# Altium PCB K601-6252双模带屏 VER 1.1 2026 10 16.PcbDoc (part 2 of 12)
Units mm, origin at the board's own origin, x right, y up, seen from the top; angles counter-clockwise.
Board outline 75.02 x 25.73 mm, 2 copper layers (Top Layer, Bottom Layer); 43 components, 67 nets, 219 pads, 157 vias.
Unrouted connection lines stored in the file: 1.
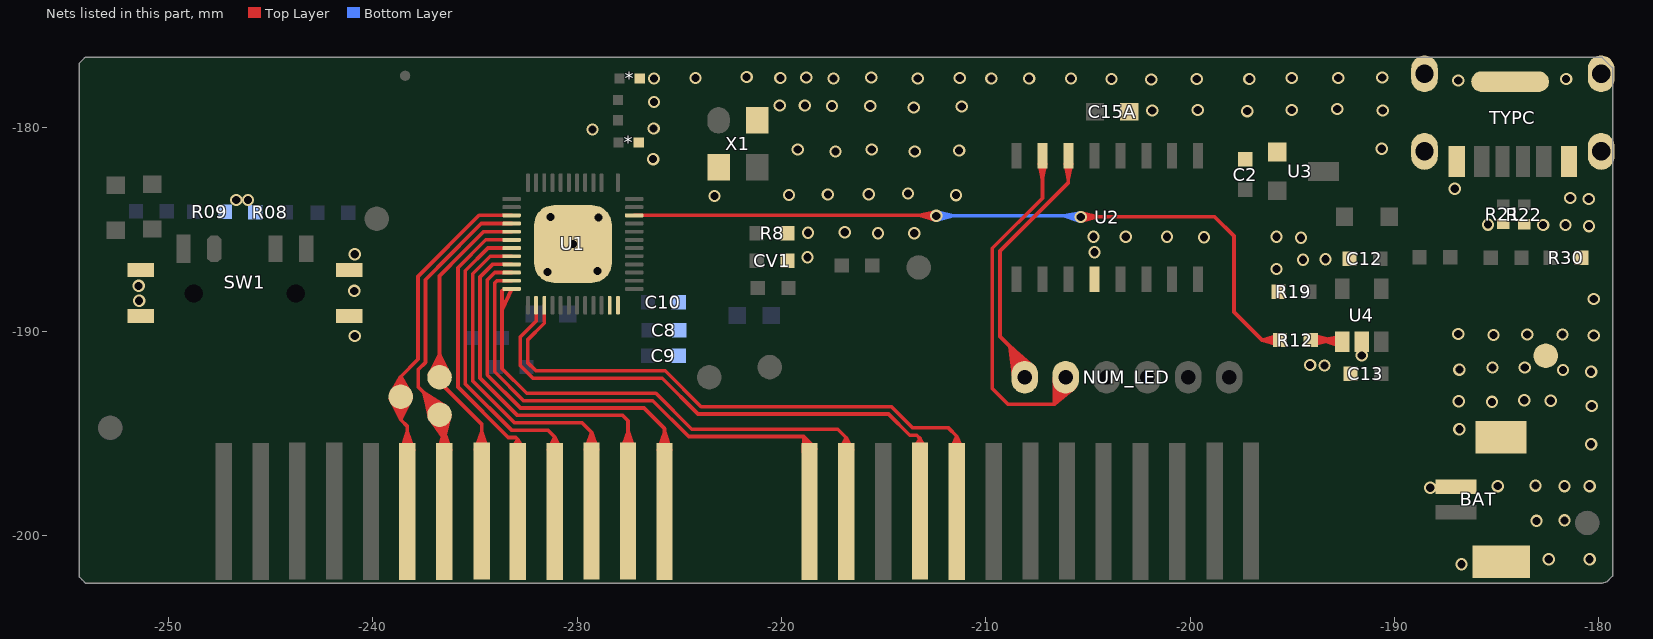
[diagram p2: the nets of this part, all layers, seen from the top]

## Via types
v1: diameter 0.6, hole 0.4, Top Layer to Bottom Layer, tented both sides, 154 vias
v2: diameter 0.6, hole 0.4, Top Layer to Bottom Layer, 3 vias

## Nets (pads, with @x,y where several pads share a name; then routed paths per layer and width w, separated by ;. In a path a pad name is that pad's centre, name@x,y a point inside that pad or via, vN(x,y) a via of type N, cw(c..) or ccw(c..) an arc to the next point about the centre after c; other vN are vias at no path point) (continued)
C6: ?.1@-238.299,-198.813 pad.@-238.625,-193.198 U1.15 | length 166.6
  Top Layer w0.18: ?.1@-238.299,-198.813 -238.299,-194.653 -238.625,-194.326 ; U1.15@-233.2,-184.323 -234.789,-184.323 -237.777,-187.311 -237.777,-191.368 -238.625,-192.216 ; pad.@-239.122,-193.313 -238.625,-194.326 ; pad.@-239.122,-193.313 -238.625,-194.326 ; pad.@-239.122,-193.313 -238.625,-194.326 ; pad.@-239.122,-193.313 -238.625,-194.326 ; pad.@-239.122,-193.313 -238.625,-194.326 ; pad.@-239.122,-193.313 -238.625,-194.326 ; pad.@-239.122,-193.313 -238.625,-194.326 ; pad.@-239.122,-193.313 -238.625,-194.326 ; pad.@-239.118,-193.065 -238.625,-192.216 ; pad.@-239.118,-193.065 -238.625,-192.216 ; pad.@-239.118,-193.065 -238.625,-192.216 ; pad.@-239.118,-193.065 -238.625,-192.216 ; pad.@-239.118,-193.065 -238.625,-192.216 ; pad.@-239.118,-193.065 -238.625,-192.216 ; pad.@-239.118,-193.065 -238.625,-192.216 ; pad.@-239.118,-193.065 -238.625,-192.216 ; pad.@-238.952,-193.246 -238.625,-194.326 ; pad.@-238.952,-193.246 -238.625,-194.326 ; pad.@-238.952,-193.246 -238.625,-194.326 ; pad.@-238.952,-193.246 -238.625,-194.326 ; pad.@-238.952,-193.246 -238.625,-194.326 ; pad.@-238.952,-193.246 -238.625,-194.326 ; pad.@-238.952,-193.246 -238.625,-194.326 ; pad.@-238.952,-193.246 -238.625,-194.326 ; pad.@-238.95,-193.142 -238.625,-192.216 ; pad.@-238.95,-193.142 -238.625,-192.216 ; pad.@-238.95,-193.142 -238.625,-192.216 ; pad.@-238.95,-193.142 -238.625,-192.216 ; pad.@-238.95,-193.142 -238.625,-192.216 ; pad.@-238.95,-193.142 -238.625,-192.216 ; pad.@-238.95,-193.142 -238.625,-192.216 ; pad.@-238.95,-193.142 -238.625,-192.216 ; pad.@-238.775,-193.208 -238.625,-194.326 ; pad.@-238.775,-193.208 -238.625,-194.326 ; pad.@-238.775,-193.208 -238.625,-194.326 ; pad.@-238.775,-193.208 -238.625,-194.326 ; pad.@-238.775,-193.208 -238.625,-194.326 ; pad.@-238.775,-193.208 -238.625,-194.326 ; pad.@-238.775,-193.208 -238.625,-194.326 ; pad.@-238.775,-193.208 -238.625,-194.326 ; pad.@-238.775,-193.186 -238.625,-192.216 ; pad.@-238.775,-193.186 -238.625,-192.216 ; pad.@-238.775,-193.186 -238.625,-192.216 ; pad.@-238.775,-193.186 -238.625,-192.216 ; pad.@-238.775,-193.186 -238.625,-192.216 ; pad.@-238.775,-193.186 -238.625,-192.216 ; pad.@-238.775,-193.186 -238.625,-192.216 ; pad.@-238.775,-193.186 -238.625,-192.216 ; -238.625,-194.326 pad.@-238.625,-193.198 ; -238.625,-194.326 pad.@-238.128,-193.313 ; -238.625,-194.326 pad.@-238.299,-193.246 ; -238.625,-194.326 pad.@-238.475,-193.208 ; -238.625,-194.326 pad.@-238.128,-193.313 ; -238.625,-194.326 pad.@-238.299,-193.246 ; -238.625,-194.326 pad.@-238.475,-193.208 ; -238.625,-194.326 pad.@-238.128,-193.313 ; -238.625,-194.326 pad.@-238.299,-193.246 ; -238.625,-194.326 pad.@-238.475,-193.208 ; -238.625,-194.326 pad.@-238.625,-193.198 ; -238.625,-194.326 pad.@-238.128,-193.313 ; -238.625,-194.326 pad.@-238.299,-193.246 ; -238.625,-194.326 pad.@-238.475,-193.208 ; -238.625,-194.326 pad.@-238.625,-193.198 ; -238.625,-194.326 pad.@-238.128,-193.313 ; -238.625,-194.326 pad.@-238.299,-193.246 ; -238.625,-194.326 pad.@-238.475,-193.208 ; -238.625,-194.326 pad.@-238.625,-193.198 ; -238.625,-194.326 pad.@-238.128,-193.313 ; -238.625,-194.326 pad.@-238.299,-193.246 ; -238.625,-194.326 pad.@-238.475,-193.208 ; -238.625,-194.326 pad.@-238.625,-193.198 ; -238.625,-194.326 pad.@-238.128,-193.313 ; -238.625,-194.326 pad.@-238.299,-193.246 ; -238.625,-194.326 pad.@-238.475,-193.208 ; -238.625,-194.326 pad.@-238.625,-193.198 ; -238.625,-194.326 pad.@-238.128,-193.313 ; -238.625,-194.326 pad.@-238.299,-193.246 ; -238.625,-194.326 pad.@-238.475,-193.208 ; -238.625,-194.326 pad.@-238.625,-193.198 ; pad.@-238.625,-193.198 -238.625,-192.216 ; pad.@-238.625,-193.198 -238.625,-192.216 ; pad.@-238.625,-193.198 -238.625,-192.216 ; pad.@-238.625,-193.198 -238.625,-192.216 ; pad.@-238.625,-193.198 -238.625,-192.216 ; pad.@-238.625,-193.198 -238.625,-192.216 ; pad.@-238.625,-193.198 -238.625,-192.216 ; -238.625,-192.216 pad.@-238.133,-193.065 ; -238.625,-192.216 pad.@-238.3,-193.142 ; -238.625,-192.216 pad.@-238.476,-193.186 ; -238.625,-192.216 pad.@-238.133,-193.065 ; -238.625,-192.216 pad.@-238.3,-193.142 ; -238.625,-192.216 pad.@-238.476,-193.186 ; -238.625,-192.216 pad.@-238.133,-193.065 ; -238.625,-192.216 pad.@-238.3,-193.142 ; -238.625,-192.216 pad.@-238.476,-193.186 ; -238.625,-192.216 pad.@-238.133,-193.065 ; -238.625,-192.216 pad.@-238.3,-193.142 ; -238.625,-192.216 pad.@-238.476,-193.186 ; -238.625,-192.216 pad.@-238.133,-193.065 ; -238.625,-192.216 pad.@-238.3,-193.142 ; -238.625,-192.216 pad.@-238.476,-193.186 ; -238.625,-192.216 pad.@-238.133,-193.065 ; -238.625,-192.216 pad.@-238.3,-193.142 ; -238.625,-192.216 pad.@-238.476,-193.186 ; -238.625,-192.216 pad.@-238.133,-193.065 ; -238.625,-192.216 pad.@-238.3,-193.142 ; -238.625,-192.216 pad.@-238.476,-193.186 ; -238.625,-192.216 pad.@-238.133,-193.065 ; -238.625,-192.216 pad.@-238.3,-193.142 ; -238.625,-192.216 pad.@-238.476,-193.186 ; ?.1@-238.605,-195.812 -238.299,-194.923 ; ?.1@-238.605,-195.812 -238.299,-194.923 ; ?.1@-238.605,-195.812 -238.299,-194.923 ; ?.1@-238.605,-195.812 -238.299,-194.923 ; ?.1@-238.605,-195.812 -238.299,-194.923 ; ?.1@-238.605,-195.812 -238.299,-194.923 ; ?.1@-238.605,-195.812 -238.299,-194.923 ; ?.1@-238.429,-195.854 -238.299,-194.923 ; ?.1@-238.429,-195.854 -238.299,-194.923 ; ?.1@-238.429,-195.854 -238.299,-194.923 ; ?.1@-238.429,-195.854 -238.299,-194.923 ; ?.1@-238.429,-195.854 -238.299,-194.923 ; ?.1@-238.429,-195.854 -238.299,-194.923 ; ?.1@-238.429,-195.854 -238.299,-194.923 ; ?.1@-238.299,-195.863 -238.299,-194.923 ; ?.1@-238.299,-195.863 -238.299,-194.923 ; ?.1@-238.299,-195.863 -238.299,-194.923 ; ?.1@-238.299,-195.863 -238.299,-194.923 ; ?.1@-238.299,-195.863 -238.299,-194.923 ; ?.1@-238.299,-195.863 -238.299,-194.923 ; ?.1@-238.299,-195.863 -238.299,-194.923 ; -238.299,-194.923 ?.1@-237.993,-195.812 ; -238.299,-194.923 ?.1@-238.169,-195.854 ; -238.299,-194.923 ?.1@-237.993,-195.812 ; -238.299,-194.923 ?.1@-238.169,-195.854 ; -238.299,-194.923 ?.1@-237.993,-195.812 ; -238.299,-194.923 ?.1@-238.169,-195.854 ; -238.299,-194.923 ?.1@-237.993,-195.812 ; -238.299,-194.923 ?.1@-238.169,-195.854 ; -238.299,-194.923 ?.1@-237.993,-195.812 ; -238.299,-194.923 ?.1@-238.169,-195.854 ; -238.299,-194.923 ?.1@-237.993,-195.812 ; -238.299,-194.923 ?.1@-238.169,-195.854 ; -238.299,-194.923 ?.1@-237.993,-195.812 ; -238.299,-194.923 ?.1@-238.169,-195.854 ; -234.19,-184.323 U1.15@-233.555,-184.323 ; -234.19,-184.323 U1.15@-233.555,-184.323 ; -234.19,-184.323 U1.15@-233.555,-184.323
C7: ?.1@-236.494,-198.813 pad.@-236.725,-194.075 U1.16 | length 208.4
  Top Layer w0.18: pad.@-237.193,-194.277 -236.51,-195.216 ; pad.@-237.194,-194.275 -236.503,-195.249 ; pad.@-237.193,-194.279 -236.492,-195.247 ; pad.@-237.191,-194.282 -237.466,-193.035 ; pad.@-237.19,-194.284 -237.474,-193.032 ; pad.@-237.038,-194.181 -236.503,-195.249 ; pad.@-237.036,-194.185 -236.497,-195.213 ; pad.@-237.017,-194.229 -237.466,-193.027 ; pad.@-237.016,-194.232 -237.488,-193.011 ; pad.@-236.87,-194.114 -236.497,-195.213 ; pad.@-236.576,-194.057 -236.51,-195.216 ; ?.1@-236.494,-198.813 -236.494,-194.307 pad.@-236.725,-194.075 ; pad.@-236.396,-194.056 -236.492,-195.247 ; pad.@-236.396,-194.061 -236.51,-195.216 ; pad.@-236.396,-194.059 -236.506,-195.205 ; pad.@-236.396,-194.059 -236.503,-195.249 ; pad.@-236.378,-193.701 -237.474,-193.032 ; pad.@-236.377,-193.702 -237.466,-193.035 ; pad.@-236.376,-193.704 -237.466,-193.027 ; pad.@-236.376,-193.703 -237.488,-193.011 ; pad.@-236.374,-193.705 -237.482,-193.006 ; pad.@-236.216,-194.093 -236.51,-195.216 ; pad.@-236.215,-194.091 -236.506,-195.205 ; pad.@-236.215,-194.089 -236.503,-195.249 ; pad.@-236.215,-194.087 -236.497,-195.213 ; U1.16@-233.2,-184.723 -234.68,-184.723 -236.805,-186.848 -236.805,-186.86 -237.417,-187.473 -237.417,-191.517 -237.775,-191.875 -237.775,-192.715 -236.725,-193.765 pad.@-236.725,-194.075 ; -237.493,-192.997 pad.@-237.19,-194.285 ; -237.493,-192.997 pad.@-236.375,-193.705 ; -237.493,-192.997 pad.@-237.016,-194.231 ; -237.493,-192.997 pad.@-236.482,-193.852 ; -237.493,-192.997 pad.@-236.852,-194.155 ; -237.493,-192.997 pad.@-236.608,-193.981 ; -237.493,-192.997 pad.@-236.725,-194.075 ; -237.493,-192.997 pad.@-237.19,-194.285 ; -237.493,-192.997 pad.@-236.375,-193.705 ; -237.493,-192.997 pad.@-237.016,-194.231 ; -237.493,-192.997 pad.@-236.482,-193.852 ; -237.493,-192.997 pad.@-236.852,-194.155 ; -237.493,-192.997 pad.@-236.608,-193.981 ; -237.493,-192.997 pad.@-236.725,-194.075 ; -237.493,-192.997 pad.@-237.19,-194.285 ; -237.493,-192.997 pad.@-236.375,-193.705 ; -237.493,-192.997 pad.@-237.016,-194.231 ; -237.493,-192.997 pad.@-236.482,-193.852 ; -237.493,-192.997 pad.@-236.852,-194.155 ; -237.493,-192.997 pad.@-236.608,-193.981 ; -237.493,-192.997 pad.@-236.725,-194.075 ; -237.493,-192.997 pad.@-237.19,-194.285 ; -237.493,-192.997 pad.@-236.375,-193.705 ; -237.493,-192.997 pad.@-237.016,-194.231 ; -237.493,-192.997 pad.@-236.482,-193.852 ; -237.493,-192.997 pad.@-236.852,-194.155 ; -237.493,-192.997 pad.@-236.608,-193.981 ; -237.493,-192.997 pad.@-236.725,-194.075 ; -237.488,-193.011 pad.@-237.19,-194.286 ; -237.488,-193.011 pad.@-236.483,-193.85 ; -237.488,-193.011 pad.@-236.852,-194.155 ; -237.488,-193.011 pad.@-236.608,-193.981 ; -237.488,-193.011 pad.@-236.725,-194.075 ; -237.482,-193.006 -237.191,-194.283 -236.497,-195.213 ; -237.482,-193.006 -237.016,-194.23 -237.466,-193.035 ; -237.482,-193.006 pad.@-236.482,-193.852 ; -237.482,-193.006 pad.@-236.852,-194.155 ; -237.482,-193.006 pad.@-236.608,-193.981 ; -237.482,-193.006 pad.@-236.725,-194.075 ; -237.474,-193.032 pad.@-237.016,-194.231 ; -237.474,-193.032 pad.@-236.484,-193.85 ; -237.474,-193.032 pad.@-236.852,-194.155 ; -237.474,-193.032 pad.@-236.609,-193.981 ; -237.474,-193.032 pad.@-236.725,-194.075 ; -237.466,-193.027 -237.192,-194.281 -236.506,-195.205 ; -237.466,-193.027 pad.@-236.482,-193.851 ; -237.466,-193.027 pad.@-236.853,-194.154 ; -237.466,-193.027 pad.@-236.608,-193.981 ; -237.466,-193.027 pad.@-236.725,-194.075 ; -237.466,-193.035 pad.@-236.483,-193.85 ; -237.466,-193.035 pad.@-236.852,-194.155 ; -237.466,-193.035 pad.@-236.608,-193.981 ; -237.466,-193.035 pad.@-236.725,-194.075 ; pad.@-237.194,-194.275 -236.494,-195.267 ; pad.@-237.194,-194.275 -236.494,-195.267 ; pad.@-237.194,-194.275 -236.494,-195.267 ; pad.@-237.194,-194.275 -236.494,-195.267 ; pad.@-237.038,-194.181 -236.494,-195.267 ; pad.@-237.038,-194.181 -236.494,-195.267 ; pad.@-237.038,-194.181 -236.494,-195.267 ; pad.@-237.038,-194.181 -236.494,-195.267 ; pad.@-237.038,-194.182 -236.51,-195.216 ; pad.@-236.87,-194.113 -236.494,-195.267 ; pad.@-236.87,-194.113 -236.494,-195.267 ; pad.@-236.87,-194.113 -236.492,-195.247 ; pad.@-236.87,-194.113 -236.494,-195.267 ; pad.@-236.87,-194.113 -236.494,-195.267 ; pad.@-236.87,-194.113 -236.506,-195.205 ; ?.1@-236.799,-195.812 -236.494,-194.923 ; ?.1@-236.799,-195.812 -236.494,-194.923 ; ?.1@-236.799,-195.812 -236.494,-194.923 ; ?.1@-236.799,-195.812 -236.494,-194.923 ; ?.1@-236.799,-195.812 -236.494,-194.923 ; ?.1@-236.799,-195.812 -236.494,-194.923 ; ?.1@-236.799,-195.812 -236.494,-194.923 ; pad.@-236.725,-194.075 -236.494,-195.267 ; pad.@-236.725,-194.075 -236.494,-195.267 ; pad.@-236.725,-194.075 -236.492,-195.247 ; pad.@-236.725,-194.075 -236.494,-195.267 ; pad.@-236.725,-194.075 -236.494,-195.267 ; pad.@-236.725,-194.075 -236.503,-195.249 ; pad.@-236.725,-194.075 -236.497,-195.213 ; pad.@-236.725,-194.075 -236.51,-195.216 ; ?.1@-236.623,-195.854 -236.494,-194.923 ; ?.1@-236.623,-195.854 -236.494,-194.923 ; ?.1@-236.623,-195.854 -236.494,-194.923 ; ?.1@-236.623,-195.854 -236.494,-194.923 ; ?.1@-236.623,-195.854 -236.494,-194.923 ; ?.1@-236.623,-195.854 -236.494,-194.923 ; ?.1@-236.623,-195.854 -236.494,-194.923 ; pad.@-236.576,-194.056 -236.494,-195.267 ; pad.@-236.576,-194.056 -236.494,-195.267 ; pad.@-236.576,-194.056 -236.494,-195.267 ; pad.@-236.576,-194.056 -236.494,-195.267 ; pad.@-236.576,-194.056 -236.503,-195.249 ; pad.@-236.576,-194.056 -236.506,-195.205 ; -236.51,-195.216 -236.871,-194.112 -236.503,-195.249 ; -236.506,-195.205 -237.037,-194.184 -236.492,-195.247 ; -236.497,-195.213 pad.@-236.396,-194.057 ; -236.497,-195.213 -236.577,-194.055 -236.492,-195.247 ; ?.1@-236.494,-195.863 -236.494,-194.923 ; ?.1@-236.494,-195.863 -236.494,-194.923 ; ?.1@-236.494,-195.863 -236.494,-194.923 ; ?.1@-236.494,-195.863 -236.494,-194.923 ; ?.1@-236.494,-195.863 -236.494,-194.923 ; ?.1@-236.494,-195.863 -236.494,-194.923 ; ?.1@-236.494,-195.863 -236.494,-194.923 ; -236.494,-195.267 pad.@-236.215,-194.085 ; -236.494,-195.267 pad.@-236.396,-194.057 ; -236.494,-195.267 pad.@-236.215,-194.085 ; -236.494,-195.267 pad.@-236.396,-194.057 ; -236.494,-195.267 pad.@-236.215,-194.085 ; -236.494,-195.267 pad.@-236.396,-194.057 ; -236.494,-195.267 pad.@-236.215,-194.085 ; -236.494,-195.267 pad.@-236.396,-194.057 ; -236.494,-194.923 ?.1@-236.188,-195.812 ; -236.494,-194.923 ?.1@-236.364,-195.854 ; -236.494,-194.923 ?.1@-236.188,-195.812 ; -236.494,-194.923 ?.1@-236.364,-195.854 ; -236.494,-194.923 ?.1@-236.188,-195.812 ; -236.494,-194.923 ?.1@-236.364,-195.854 ; -236.494,-194.923 ?.1@-236.188,-195.812 ; -236.494,-194.923 ?.1@-236.364,-195.854 ; -236.494,-194.923 ?.1@-236.188,-195.812 ; -236.494,-194.923 ?.1@-236.364,-195.854 ; -236.494,-194.923 ?.1@-236.188,-195.812 ; -236.494,-194.923 ?.1@-236.364,-195.854 ; -236.494,-194.923 ?.1@-236.188,-195.812 ; -236.494,-194.923 ?.1@-236.364,-195.854 ; -236.492,-195.247 pad.@-236.215,-194.084 ; -234.19,-184.723 U1.16@-233.555,-184.723 ; -234.19,-184.723 U1.16@-233.555,-184.723 ; -234.19,-184.723 U1.16@-233.555,-184.723
C8: ?.1@-218.621,-198.813 U1.23 | length 83.6
  Top Layer w0.18: U1.23@-233.2,-187.522 -233.916,-187.522 ; ?.1@-218.621,-198.813 -218.621,-195.434 ; -233.916,-187.522 -234.026,-187.632 -234.026,-191.979 -232.614,-193.391 -226.289,-193.391 -224.534,-195.146 -218.909,-195.146 ; -233.916,-187.522 U1.23@-233.555,-187.522 ; -233.916,-187.522 U1.23@-233.555,-187.522 ; -233.916,-187.522 U1.23@-233.555,-187.522 ; ?.1@-218.926,-195.919 -218.909,-195.146 ; ?.1@-218.926,-195.919 -218.909,-195.146 ; ?.1@-218.926,-195.919 -218.909,-195.146 ; ?.1@-218.926,-195.919 -218.909,-195.146 ; ?.1@-218.926,-195.919 -218.909,-195.146 ; ?.1@-218.926,-195.919 -218.909,-195.146 ; ?.1@-218.926,-195.919 -218.909,-195.146 ; ?.1@-218.91,-195.751 -218.621,-195.434 ; ?.1@-218.91,-195.751 -218.621,-195.434 ; ?.1@-218.91,-195.751 -218.621,-195.434 ; ?.1@-218.91,-195.751 -218.621,-195.434 ; ?.1@-218.91,-195.751 -218.621,-195.434 ; ?.1@-218.91,-195.751 -218.621,-195.434 ; ?.1@-218.91,-195.751 -218.621,-195.434 ; ?.1@-218.91,-195.751 -218.621,-195.434 ; ?.1@-218.91,-195.751 -218.621,-195.434 ; ?.1@-218.91,-195.751 -218.621,-195.434 ; ?.1@-218.91,-195.751 -218.621,-195.434 ; ?.1@-218.91,-195.751 -218.621,-195.434 ; ?.1@-218.91,-195.751 -218.621,-195.434 ; ?.1@-218.91,-195.751 -218.621,-195.434 ; -218.909,-195.146 -218.621,-195.434 ; -218.909,-195.146 ?.1@-218.363,-195.692 ; -218.909,-195.146 ?.1@-218.746,-195.901 ; -218.909,-195.146 ?.1@-218.505,-195.805 ; -218.909,-195.146 ?.1@-218.621,-195.863 ; -218.909,-195.146 ?.1@-218.363,-195.692 ; -218.909,-195.146 ?.1@-218.746,-195.901 ; -218.909,-195.146 ?.1@-218.505,-195.805 ; -218.909,-195.146 ?.1@-218.621,-195.863 ; -218.909,-195.146 ?.1@-218.363,-195.692 ; -218.909,-195.146 ?.1@-218.746,-195.901 ; -218.909,-195.146 ?.1@-218.505,-195.805 ; -218.909,-195.146 ?.1@-218.621,-195.863 ; -218.909,-195.146 ?.1@-218.363,-195.692 ; -218.909,-195.146 ?.1@-218.746,-195.901 ; -218.909,-195.146 ?.1@-218.505,-195.805 ; -218.909,-195.146 ?.1@-218.621,-195.863 ; -218.909,-195.146 ?.1@-218.363,-195.692 ; -218.909,-195.146 ?.1@-218.746,-195.901 ; -218.909,-195.146 ?.1@-218.505,-195.805 ; -218.909,-195.146 ?.1@-218.621,-195.863 ; -218.909,-195.146 ?.1@-218.363,-195.692 ; -218.909,-195.146 ?.1@-218.746,-195.901 ; -218.909,-195.146 ?.1@-218.505,-195.805 ; -218.909,-195.146 ?.1@-218.621,-195.863 ; -218.909,-195.146 ?.1@-218.363,-195.692 ; -218.909,-195.146 ?.1@-218.746,-195.901 ; -218.909,-195.146 ?.1@-218.505,-195.805 ; -218.909,-195.146 ?.1@-218.621,-195.863 ; ?.1@-218.75,-195.844 -218.621,-195.434 ; ?.1@-218.75,-195.844 -218.621,-195.434 ; ?.1@-218.75,-195.844 -218.621,-195.434 ; ?.1@-218.75,-195.844 -218.621,-195.434 ; ?.1@-218.75,-195.844 -218.621,-195.434 ; ?.1@-218.75,-195.844 -218.621,-195.434 ; ?.1@-218.75,-195.844 -218.621,-195.434 ; ?.1@-218.75,-195.844 -218.621,-195.434 ; ?.1@-218.75,-195.844 -218.621,-195.434 ; ?.1@-218.75,-195.844 -218.621,-195.434 ; ?.1@-218.75,-195.844 -218.621,-195.434 ; ?.1@-218.75,-195.844 -218.621,-195.434 ; ?.1@-218.75,-195.844 -218.621,-195.434 ; ?.1@-218.75,-195.844 -218.621,-195.434 ; ?.1@-218.621,-195.863 -218.621,-195.434 ; ?.1@-218.621,-195.863 -218.621,-195.434 ; ?.1@-218.621,-195.863 -218.621,-195.434 ; ?.1@-218.621,-195.863 -218.621,-195.434 ; ?.1@-218.621,-195.863 -218.621,-195.434 ; ?.1@-218.621,-195.863 -218.621,-195.434 ; ?.1@-218.621,-195.863 -218.621,-195.434 ; ?.1@-218.621,-195.863 -218.621,-195.434 ; ?.1@-218.621,-195.863 -218.621,-195.434 ; ?.1@-218.621,-195.863 -218.621,-195.434 ; ?.1@-218.621,-195.863 -218.621,-195.434 ; ?.1@-218.621,-195.863 -218.621,-195.434 ; ?.1@-218.621,-195.863 -218.621,-195.434 ; ?.1@-218.621,-195.863 -218.621,-195.434 ; -218.621,-195.434 ?.1@-218.332,-195.751 ; -218.621,-195.434 ?.1@-218.493,-195.844 ; -218.621,-195.434 ?.1@-218.332,-195.751 ; -218.621,-195.434 ?.1@-218.493,-195.844 ; -218.621,-195.434 ?.1@-218.332,-195.751 ; -218.621,-195.434 ?.1@-218.493,-195.844 ; -218.621,-195.434 ?.1@-218.332,-195.751 ; -218.621,-195.434 ?.1@-218.493,-195.844 ; -218.621,-195.434 ?.1@-218.332,-195.751 ; -218.621,-195.434 ?.1@-218.493,-195.844 ; -218.621,-195.434 ?.1@-218.332,-195.751 ; -218.621,-195.434 ?.1@-218.493,-195.844 ; -218.621,-195.434 ?.1@-218.332,-195.751 ; -218.621,-195.434 ?.1@-218.493,-195.844 ; -218.621,-195.434 ?.1@-218.332,-195.751 ; -218.621,-195.434 ?.1@-218.493,-195.844 ; -218.621,-195.434 ?.1@-218.332,-195.751 ; -218.621,-195.434 ?.1@-218.493,-195.844 ; -218.621,-195.434 ?.1@-218.332,-195.751 ; -218.621,-195.434 ?.1@-218.493,-195.844 ; -218.621,-195.434 ?.1@-218.332,-195.751 ; -218.621,-195.434 ?.1@-218.493,-195.844 ; -218.621,-195.434 ?.1@-218.332,-195.751 ; -218.621,-195.434 ?.1@-218.493,-195.844 ; -218.621,-195.434 ?.1@-218.332,-195.751 ; -218.621,-195.434 ?.1@-218.493,-195.844 ; -218.621,-195.434 ?.1@-218.332,-195.751 ; -218.621,-195.434 ?.1@-218.493,-195.844
C9: ?.1@-216.819,-198.813 U1.24 | length 50.9
  Top Layer w0.18: -233.471,-188.507 U1.24@-233.2,-187.923 ; ?.1@-216.819,-196.698 -216.819,-195.203 ; -233.666,-188.023 -233.566,-187.923 U1.24@-233.2,-187.923 ; -233.666,-188.023 -233.666,-191.83 -232.465,-193.031 -226.14,-193.031 -224.385,-194.786 -217.237,-194.786 -216.819,-195.203 ; -233.666,-188.023 U1.24@-233.555,-187.923 ; -233.666,-188.023 U1.24@-233.555,-187.923 ; -233.666,-188.023 U1.24@-233.555,-187.923 ; -233.666,-188.023 U1.24@-233.555,-187.923 ; -233.666,-188.023 U1.24@-233.555,-187.923 ; -233.666,-188.023 U1.24@-233.555,-187.923 ; U1.24@-233.2,-187.923 -233.666,-188.927 U1.24@-233.2,-187.923 ; ?.1@-217.121,-195.791 -216.819,-195.203 ; ?.1@-217.121,-195.791 -216.819,-195.203 ; ?.1@-217.121,-195.791 -216.819,-195.203 ; ?.1@-217.121,-195.791 -216.819,-195.203 ; ?.1@-217.121,-195.791 -216.819,-195.203 ; ?.1@-217.121,-195.791 -216.819,-195.203 ; ?.1@-217.121,-195.791 -216.819,-195.203 ; ?.1@-216.949,-195.851 -216.819,-195.203 ; ?.1@-216.949,-195.851 -216.819,-195.203 ; ?.1@-216.949,-195.851 -216.819,-195.203 ; ?.1@-216.949,-195.851 -216.819,-195.203 ; ?.1@-216.949,-195.851 -216.819,-195.203 ; ?.1@-216.949,-195.851 -216.819,-195.203 ; ?.1@-216.949,-195.851 -216.819,-195.203 ; ?.1@-216.819,-195.863 -216.819,-195.203 ; ?.1@-216.819,-195.863 -216.819,-195.203 ; ?.1@-216.819,-195.863 -216.819,-195.203 ; ?.1@-216.819,-195.863 -216.819,-195.203 ; ?.1@-216.819,-195.863 -216.819,-195.203 ; ?.1@-216.819,-195.863 -216.819,-195.203 ; ?.1@-216.819,-195.863 -216.819,-195.203 ; -216.819,-195.203 ?.1@-216.518,-195.791 ; -216.819,-195.203 ?.1@-216.69,-195.851 ; -216.819,-195.203 ?.1@-216.518,-195.791 ; -216.819,-195.203 ?.1@-216.69,-195.851 ; -216.819,-195.203 ?.1@-216.518,-195.791 ; -216.819,-195.203 ?.1@-216.69,-195.851 ; -216.819,-195.203 ?.1@-216.518,-195.791 ; -216.819,-195.203 ?.1@-216.69,-195.851 ; -216.819,-195.203 ?.1@-216.518,-195.791 ; -216.819,-195.203 ?.1@-216.69,-195.851 ; -216.819,-195.203 ?.1@-216.518,-195.791 ; -216.819,-195.203 ?.1@-216.69,-195.851 ; -216.819,-195.203 ?.1@-216.518,-195.791 ; -216.819,-195.203 ?.1@-216.69,-195.851
C10: ?.1@-225.715,-198.813 U1.22 | length 54.1
  Top Layer w0.18: U1.22@-233.2,-187.123 -234.026,-187.123 ; ?.1@-225.715,-195.998 -225.715,-194.758 -226.722,-193.751 -232.763,-193.751 -234.386,-192.128 -234.386,-187.483 -234.026,-187.123 ; -234.026,-187.123 U1.22@-233.555,-187.123 ; -234.026,-187.123 U1.22@-233.555,-187.123 ; -234.026,-187.123 U1.22@-233.555,-187.123 ; ?.1@-226.021,-195.812 -225.715,-194.923 ; ?.1@-226.021,-195.812 -225.715,-194.923 ; ?.1@-226.021,-195.812 -225.715,-194.923 ; ?.1@-226.021,-195.812 -225.715,-194.923 ; ?.1@-226.021,-195.812 -225.715,-194.923 ; ?.1@-226.021,-195.812 -225.715,-194.923 ; ?.1@-226.021,-195.812 -225.715,-194.923 ; ?.1@-225.845,-195.854 -225.715,-194.923 ; ?.1@-225.845,-195.854 -225.715,-194.923 ; ?.1@-225.845,-195.854 -225.715,-194.923 ; ?.1@-225.845,-195.854 -225.715,-194.923 ; ?.1@-225.845,-195.854 -225.715,-194.923 ; ?.1@-225.845,-195.854 -225.715,-194.923 ; ?.1@-225.845,-195.854 -225.715,-194.923 ; ?.1@-225.715,-195.863 -225.715,-194.923 ; ?.1@-225.715,-195.863 -225.715,-194.923 ; ?.1@-225.715,-195.863 -225.715,-194.923 ; ?.1@-225.715,-195.863 -225.715,-194.923 ; ?.1@-225.715,-195.863 -225.715,-194.923 ; ?.1@-225.715,-195.863 -225.715,-194.923 ; ?.1@-225.715,-195.863 -225.715,-194.923 ; -225.715,-194.923 ?.1@-225.409,-195.812 ; -225.715,-194.923 ?.1@-225.585,-195.854 ; -225.715,-194.923 ?.1@-225.409,-195.812 ; -225.715,-194.923 ?.1@-225.585,-195.854 ; -225.715,-194.923 ?.1@-225.409,-195.812 ; -225.715,-194.923 ?.1@-225.585,-195.854 ; -225.715,-194.923 ?.1@-225.409,-195.812 ; -225.715,-194.923 ?.1@-225.585,-195.854 ; -225.715,-194.923 ?.1@-225.409,-195.812 ; -225.715,-194.923 ?.1@-225.585,-195.854 ; -225.715,-194.923 ?.1@-225.409,-195.812 ; -225.715,-194.923 ?.1@-225.585,-195.854 ; -225.715,-194.923 ?.1@-225.409,-195.812 ; -225.715,-194.923 ?.1@-225.585,-195.854
  Top Layer w0.203: ?.1@-225.715,-198.813 ?.1@-225.715,-195.998
C11: ?.1@-229.287,-198.794 U1.20 | length 52
  Top Layer w0.18: U1.20@-233.2,-186.323 -234.244,-186.323 -235.106,-187.184 -235.106,-192.427 -233.061,-194.471 -229.75,-194.471 -229.287,-194.933 ; ?.1@-229.287,-198.794 -229.287,-194.933 ; -234.19,-186.323 U1.20@-233.555,-186.323 ; -234.19,-186.323 U1.20@-233.555,-186.323 ; -234.19,-186.323 U1.20@-233.555,-186.323 ; ?.1@-229.593,-195.791 -229.287,-194.933 ; ?.1@-229.593,-195.791 -229.287,-194.933 ; ?.1@-229.593,-195.791 -229.287,-194.933 ; ?.1@-229.593,-195.791 -229.287,-194.933 ; ?.1@-229.593,-195.791 -229.287,-194.933 ; ?.1@-229.593,-195.791 -229.287,-194.933 ; ?.1@-229.593,-195.791 -229.287,-194.933 ; ?.1@-229.417,-195.834 -229.287,-194.933 ; ?.1@-229.417,-195.834 -229.287,-194.933 ; ?.1@-229.417,-195.834 -229.287,-194.933 ; ?.1@-229.417,-195.834 -229.287,-194.933 ; ?.1@-229.417,-195.834 -229.287,-194.933 ; ?.1@-229.417,-195.834 -229.287,-194.933 ; ?.1@-229.417,-195.834 -229.287,-194.933 ; ?.1@-229.287,-195.844 -229.287,-194.933 ; ?.1@-229.287,-195.844 -229.287,-194.933 ; ?.1@-229.287,-195.844 -229.287,-194.933 ; ?.1@-229.287,-195.844 -229.287,-194.933 ; ?.1@-229.287,-195.844 -229.287,-194.933 ; ?.1@-229.287,-195.844 -229.287,-194.933 ; ?.1@-229.287,-195.844 -229.287,-194.933 ; -229.287,-194.933 ?.1@-228.982,-195.791 ; -229.287,-194.933 ?.1@-229.158,-195.834 ; -229.287,-194.933 ?.1@-228.982,-195.791 ; -229.287,-194.933 ?.1@-229.158,-195.834 ; -229.287,-194.933 ?.1@-228.982,-195.791 ; -229.287,-194.933 ?.1@-229.158,-195.834 ; -229.287,-194.933 ?.1@-228.982,-195.791 ; -229.287,-194.933 ?.1@-229.158,-195.834 ; -229.287,-194.933 ?.1@-228.982,-195.791 ; -229.287,-194.933 ?.1@-229.158,-195.834 ; -229.287,-194.933 ?.1@-228.982,-195.791 ; -229.287,-194.933 ?.1@-229.158,-195.834 ; -229.287,-194.933 ?.1@-228.982,-195.791 ; -229.287,-194.933 ?.1@-229.158,-195.834
C12: ?.1@-231.091,-198.813 U1.19 | length 43.4
  Top Layer w0.18: U1.19@-233.2,-185.923 -234.353,-185.923 -235.466,-187.035 -235.466,-192.576 -233.211,-194.831 -231.434,-194.831 -231.091,-195.174 ; ?.1@-231.091,-198.813 -231.091,-195.174 ; -234.19,-185.923 U1.19@-233.555,-185.923 ; -234.19,-185.923 U1.19@-233.555,-185.923 ; -234.19,-185.923 U1.19@-233.555,-185.923 ; ?.1@-231.393,-195.794 -231.091,-195.174 ; ?.1@-231.393,-195.794 -231.091,-195.174 ; ?.1@-231.393,-195.794 -231.091,-195.174 ; ?.1@-231.393,-195.794 -231.091,-195.174 ; ?.1@-231.393,-195.794 -231.091,-195.174 ; ?.1@-231.393,-195.794 -231.091,-195.174 ; ?.1@-231.393,-195.794 -231.091,-195.174 ; ?.1@-231.221,-195.851 -231.091,-195.174 ; ?.1@-231.221,-195.851 -231.091,-195.174 ; ?.1@-231.221,-195.851 -231.091,-195.174 ; ?.1@-231.221,-195.851 -231.091,-195.174 ; ?.1@-231.221,-195.851 -231.091,-195.174 ; ?.1@-231.221,-195.851 -231.091,-195.174 ; ?.1@-231.221,-195.851 -231.091,-195.174 ; ?.1@-231.091,-195.863 -231.091,-195.174 ; ?.1@-231.091,-195.863 -231.091,-195.174 ; ?.1@-231.091,-195.863 -231.091,-195.174 ; ?.1@-231.091,-195.863 -231.091,-195.174 ; ?.1@-231.091,-195.863 -231.091,-195.174 ; ?.1@-231.091,-195.863 -231.091,-195.174 ; ?.1@-231.091,-195.863 -231.091,-195.174 ; -231.091,-195.174 ?.1@-230.789,-195.794 ; -231.091,-195.174 ?.1@-230.962,-195.851 ; -231.091,-195.174 ?.1@-230.789,-195.794 ; -231.091,-195.174 ?.1@-230.962,-195.851 ; -231.091,-195.174 ?.1@-230.789,-195.794 ; -231.091,-195.174 ?.1@-230.962,-195.851 ; -231.091,-195.174 ?.1@-230.789,-195.794 ; -231.091,-195.174 ?.1@-230.962,-195.851 ; -231.091,-195.174 ?.1@-230.789,-195.794 ; -231.091,-195.174 ?.1@-230.962,-195.851 ; -231.091,-195.174 ?.1@-230.789,-195.794 ; -231.091,-195.174 ?.1@-230.962,-195.851 ; -231.091,-195.174 ?.1@-230.789,-195.794 ; -231.091,-195.174 ?.1@-230.962,-195.851
C13: ?.1@-232.895,-198.813 U1.18 | length 38.4
  Top Layer w0.18: U1.18@-233.2,-185.522 -234.462,-185.522 -235.826,-186.886 -235.826,-192.725 -233.36,-195.191 -232.997,-195.191 -232.895,-195.293 ; ?.1@-232.895,-198.813 -232.895,-195.293 ; -234.19,-185.522 U1.18@-233.555,-185.522 ; -234.19,-185.522 U1.18@-233.555,-185.522 ; -234.19,-185.522 U1.18@-233.555,-185.522 ; ?.1@-233.193,-195.779 -232.895,-195.293 ; ?.1@-233.193,-195.779 -232.895,-195.293 ; ?.1@-233.193,-195.779 -232.895,-195.293 ; ?.1@-233.193,-195.779 -232.895,-195.293 ; ?.1@-233.193,-195.779 -232.895,-195.293 ; ?.1@-233.193,-195.779 -232.895,-195.293 ; ?.1@-233.193,-195.779 -232.895,-195.293 ; ?.1@-233.024,-195.849 -232.895,-195.293 ; ?.1@-233.024,-195.849 -232.895,-195.293 ; ?.1@-233.024,-195.849 -232.895,-195.293 ; ?.1@-233.024,-195.849 -232.895,-195.293 ; ?.1@-233.024,-195.849 -232.895,-195.293 ; ?.1@-233.024,-195.849 -232.895,-195.293 ; ?.1@-233.024,-195.849 -232.895,-195.293 ; ?.1@-232.895,-195.863 -232.895,-195.293 ; ?.1@-232.895,-195.863 -232.895,-195.293 ; ?.1@-232.895,-195.863 -232.895,-195.293 ; ?.1@-232.895,-195.863 -232.895,-195.293 ; ?.1@-232.895,-195.863 -232.895,-195.293 ; ?.1@-232.895,-195.863 -232.895,-195.293 ; ?.1@-232.895,-195.863 -232.895,-195.293 ; -232.895,-195.293 ?.1@-232.597,-195.779 ; -232.895,-195.293 ?.1@-232.766,-195.849 ; -232.895,-195.293 ?.1@-232.597,-195.779 ; -232.895,-195.293 ?.1@-232.766,-195.849 ; -232.895,-195.293 ?.1@-232.597,-195.779 ; -232.895,-195.293 ?.1@-232.766,-195.849 ; -232.895,-195.293 ?.1@-232.597,-195.779 ; -232.895,-195.293 ?.1@-232.766,-195.849 ; -232.895,-195.293 ?.1@-232.597,-195.779 ; -232.895,-195.293 ?.1@-232.766,-195.849 ; -232.895,-195.293 ?.1@-232.597,-195.779 ; -232.895,-195.293 ?.1@-232.766,-195.849 ; -232.895,-195.293 ?.1@-232.597,-195.779 ; -232.895,-195.293 ?.1@-232.766,-195.849
C14: ?.1@-234.668,-198.794 pad.@-236.725,-192.25 U1.17 | length 113.2
  Top Layer w0.18: ?.1@-234.668,-198.794 -234.668,-194.529 -236.725,-192.473 pad.@-236.725,-192.25 ; U1.17@-233.2,-185.123 -234.571,-185.123 -236.186,-186.737 -236.186,-186.75 -236.725,-187.289 pad.@-236.725,-192.25 ; pad.@-237.222,-192.136 -236.725,-191.11 ; pad.@-237.222,-192.136 -236.725,-191.11 ; pad.@-237.222,-192.136 -236.725,-191.11 ; pad.@-237.222,-192.136 -236.725,-191.11 ; pad.@-237.222,-192.136 -236.725,-191.11 ; pad.@-237.222,-192.136 -236.725,-191.11 ; pad.@-237.222,-192.136 -236.725,-191.11 ; pad.@-237.222,-192.136 -236.725,-191.11 ; pad.@-237.052,-192.202 -236.725,-191.11 ; pad.@-237.052,-192.202 -236.725,-191.11 ; pad.@-237.052,-192.202 -236.725,-191.11 ; pad.@-237.052,-192.202 -236.725,-191.11 ; pad.@-237.052,-192.202 -236.725,-191.11 ; pad.@-237.052,-192.202 -236.725,-191.11 ; pad.@-237.052,-192.202 -236.725,-191.11 ; pad.@-237.052,-192.202 -236.725,-191.11 ; pad.@-236.875,-192.24 -236.725,-191.11 ; pad.@-236.875,-192.24 -236.725,-191.11 ; pad.@-236.875,-192.24 -236.725,-191.11 ; pad.@-236.875,-192.24 -236.725,-191.11 ; pad.@-236.875,-192.24 -236.725,-191.11 ; pad.@-236.875,-192.24 -236.725,-191.11 ; pad.@-236.875,-192.24 -236.725,-191.11 ; pad.@-236.875,-192.24 -236.725,-191.11 ; pad.@-236.725,-192.25 -236.725,-191.11 ; pad.@-236.725,-192.25 -236.725,-191.11 ; pad.@-236.725,-192.25 -236.725,-191.11 ; pad.@-236.725,-192.25 -236.725,-191.11 ; pad.@-236.725,-192.25 -236.725,-191.11 ; pad.@-236.725,-192.25 -236.725,-191.11 ; -236.725,-191.11 pad.@-236.228,-192.136 ; -236.725,-191.11 pad.@-236.399,-192.202 ; -236.725,-191.11 pad.@-236.575,-192.24 ; -236.725,-191.11 pad.@-236.228,-192.136 ; -236.725,-191.11 pad.@-236.399,-192.202 ; -236.725,-191.11 pad.@-236.575,-192.24 ; -236.725,-191.11 pad.@-236.228,-192.136 ; -236.725,-191.11 pad.@-236.399,-192.202 ; -236.725,-191.11 pad.@-236.575,-192.24 ; -236.725,-191.11 pad.@-236.228,-192.136 ; -236.725,-191.11 pad.@-236.399,-192.202 ; -236.725,-191.11 pad.@-236.575,-192.24 ; -236.725,-191.11 pad.@-236.228,-192.136 ; -236.725,-191.11 pad.@-236.399,-192.202 ; -236.725,-191.11 pad.@-236.575,-192.24 ; -236.725,-191.11 pad.@-236.228,-192.136 ; -236.725,-191.11 pad.@-236.399,-192.202 ; -236.725,-191.11 pad.@-236.575,-192.24 ; -236.725,-191.11 pad.@-236.228,-192.136 ; -236.725,-191.11 pad.@-236.399,-192.202 ; -236.725,-191.11 pad.@-236.575,-192.24 ; -236.725,-191.11 pad.@-236.228,-192.136 ; -236.725,-191.11 pad.@-236.399,-192.202 ; -236.725,-191.11 pad.@-236.575,-192.24 ; ?.1@-234.974,-195.792 -234.668,-194.904 ; ?.1@-234.974,-195.792 -234.668,-194.904 ; ?.1@-234.974,-195.792 -234.668,-194.904 ; ?.1@-234.974,-195.792 -234.668,-194.904 ; ?.1@-234.974,-195.792 -234.668,-194.904 ; ?.1@-234.974,-195.792 -234.668,-194.904 ; ?.1@-234.974,-195.792 -234.668,-194.904 ; ?.1@-234.798,-195.835 -234.668,-194.904 ; ?.1@-234.798,-195.835 -234.668,-194.904 ; ?.1@-234.798,-195.835 -234.668,-194.904 ; ?.1@-234.798,-195.835 -234.668,-194.904 ; ?.1@-234.798,-195.835 -234.668,-194.904 ; ?.1@-234.798,-195.835 -234.668,-194.904 ; ?.1@-234.798,-195.835 -234.668,-194.904 ; ?.1@-234.668,-195.844 -234.668,-194.904 ; ?.1@-234.668,-195.844 -234.668,-194.904 ; ?.1@-234.668,-195.844 -234.668,-194.904 ; ?.1@-234.668,-195.844 -234.668,-194.904 ; ?.1@-234.668,-195.844 -234.668,-194.904 ; ?.1@-234.668,-195.844 -234.668,-194.904 ; ?.1@-234.668,-195.844 -234.668,-194.904 ; -234.668,-194.904 ?.1@-234.363,-195.792 ; -234.668,-194.904 ?.1@-234.539,-195.835 ; -234.668,-194.904 ?.1@-234.363,-195.792 ; -234.668,-194.904 ?.1@-234.539,-195.835 ; -234.668,-194.904 ?.1@-234.363,-195.792 ; -234.668,-194.904 ?.1@-234.539,-195.835 ; -234.668,-194.904 ?.1@-234.363,-195.792 ; -234.668,-194.904 ?.1@-234.539,-195.835 ; -234.668,-194.904 ?.1@-234.363,-195.792 ; -234.668,-194.904 ?.1@-234.539,-195.835 ; -234.668,-194.904 ?.1@-234.363,-195.792 ; -234.668,-194.904 ?.1@-234.539,-195.835 ; -234.668,-194.904 ?.1@-234.363,-195.792 ; -234.668,-194.904 ?.1@-234.539,-195.835 ; -234.19,-185.123 U1.17@-233.555,-185.123 ; -234.19,-185.123 U1.17@-233.555,-185.123 ; -234.19,-185.123 U1.17@-233.555,-185.123
C15: ?.1@-227.503,-198.78 U1.21 | length 53.9
  Top Layer w0.18: U1.21@-233.2,-186.723 -234.135,-186.723 ; ?.1@-227.503,-198.78 -227.503,-194.37 -227.762,-194.111 -232.912,-194.111 -234.746,-192.277 -234.746,-187.334 -234.135,-186.723 ; -234.135,-186.723 U1.21@-233.555,-186.723 ; -234.135,-186.723 U1.21@-233.555,-186.723 ; -234.135,-186.723 U1.21@-233.555,-186.723 ; ?.1@-227.809,-195.779 -227.503,-194.89 ; ?.1@-227.809,-195.779 -227.503,-194.89 ; ?.1@-227.809,-195.779 -227.503,-194.89 ; ?.1@-227.809,-195.779 -227.503,-194.89 ; ?.1@-227.809,-195.779 -227.503,-194.89 ; ?.1@-227.809,-195.779 -227.503,-194.89 ; ?.1@-227.809,-195.779 -227.503,-194.89 ; ?.1@-227.633,-195.821 -227.503,-194.89 ; ?.1@-227.633,-195.821 -227.503,-194.89 ; ?.1@-227.633,-195.821 -227.503,-194.89 ; ?.1@-227.633,-195.821 -227.503,-194.89 ; ?.1@-227.633,-195.821 -227.503,-194.89 ; ?.1@-227.633,-195.821 -227.503,-194.89 ; ?.1@-227.633,-195.821 -227.503,-194.89 ; ?.1@-227.503,-195.83 -227.503,-194.89 ; ?.1@-227.503,-195.83 -227.503,-194.89 ; ?.1@-227.503,-195.83 -227.503,-194.89 ; ?.1@-227.503,-195.83 -227.503,-194.89 ; ?.1@-227.503,-195.83 -227.503,-194.89 ; ?.1@-227.503,-195.83 -227.503,-194.89 ; ?.1@-227.503,-195.83 -227.503,-194.89 ; -227.503,-194.89 ?.1@-227.197,-195.779 ; -227.503,-194.89 ?.1@-227.373,-195.821 ; -227.503,-194.89 ?.1@-227.197,-195.779 ; -227.503,-194.89 ?.1@-227.373,-195.821 ; -227.503,-194.89 ?.1@-227.197,-195.779 ; -227.503,-194.89 ?.1@-227.373,-195.821 ; -227.503,-194.89 ?.1@-227.197,-195.779 ; -227.503,-194.89 ?.1@-227.373,-195.821 ; -227.503,-194.89 ?.1@-227.197,-195.779 ; -227.503,-194.89 ?.1@-227.373,-195.821 ; -227.503,-194.89 ?.1@-227.197,-195.779 ; -227.503,-194.89 ?.1@-227.373,-195.821 ; -227.503,-194.89 ?.1@-227.197,-195.779 ; -227.503,-194.89 ?.1@-227.373,-195.821
C16: ?.1@-213.218,-198.794 U1.26 | length 50.2
  Top Layer w0.18: U1.26@-232,-188.723 -232,-189.498 ; ?.1@-213.218,-198.794 -213.218,-195.24 ; -232,-189.498 -232.777,-190.274 -232.777,-191.668 -232.157,-192.288 -225.832,-192.288 -224.077,-194.043 -214.757,-194.043 -213.717,-195.083 -213.375,-195.083 -213.218,-195.24 ; -232,-189.498 U1.26@-232,-189.078 ; -232,-189.498 U1.26@-232,-189.078 ; -232,-189.498 U1.26@-232,-189.078 ; ?.1@-213.517,-195.764 -213.218,-195.24 ; ?.1@-213.517,-195.764 -213.218,-195.24 ; ?.1@-213.517,-195.764 -213.218,-195.24 ; ?.1@-213.517,-195.764 -213.218,-195.24 ; ?.1@-213.517,-195.764 -213.218,-195.24 ; ?.1@-213.517,-195.764 -213.218,-195.24 ; ?.1@-213.517,-195.764 -213.218,-195.24 ; ?.1@-213.347,-195.83 -213.218,-195.24 ; ?.1@-213.347,-195.83 -213.218,-195.24 ; ?.1@-213.347,-195.83 -213.218,-195.24 ; ?.1@-213.347,-195.83 -213.218,-195.24 ; ?.1@-213.347,-195.83 -213.218,-195.24 ; ?.1@-213.347,-195.83 -213.218,-195.24 ; ?.1@-213.347,-195.83 -213.218,-195.24 ; ?.1@-213.218,-195.844 -213.218,-195.24 ; ?.1@-213.218,-195.844 -213.218,-195.24 ; ?.1@-213.218,-195.844 -213.218,-195.24 ; ?.1@-213.218,-195.844 -213.218,-195.24 ; ?.1@-213.218,-195.844 -213.218,-195.24 ; ?.1@-213.218,-195.844 -213.218,-195.24 ; ?.1@-213.218,-195.844 -213.218,-195.24 ; -213.218,-195.24 ?.1@-212.918,-195.764 ; -213.218,-195.24 ?.1@-213.088,-195.83 ; -213.218,-195.24 ?.1@-212.918,-195.764 ; -213.218,-195.24 ?.1@-213.088,-195.83 ; -213.218,-195.24 ?.1@-212.918,-195.764 ; -213.218,-195.24 ?.1@-213.088,-195.83 ; -213.218,-195.24 ?.1@-212.918,-195.764 ; -213.218,-195.24 ?.1@-213.088,-195.83 ; -213.218,-195.24 ?.1@-212.918,-195.764 ; -213.218,-195.24 ?.1@-213.088,-195.83 ; -213.218,-195.24 ?.1@-212.918,-195.764 ; -213.218,-195.24 ?.1@-213.088,-195.83 ; -213.218,-195.24 ?.1@-212.918,-195.764 ; -213.218,-195.24 ?.1@-213.088,-195.83
C17: ?.1@-211.413,-198.813 U1.27 | length 56.4
  Top Layer w0.18: U1.27@-231.6,-188.723 -231.6,-189.607 ; ?.1@-211.413,-198.813 -211.413,-195.134 ; -231.6,-189.607 -232.417,-190.423 -232.417,-191.519 -232.008,-191.928 -225.683,-191.928 -223.928,-193.683 -214.608,-193.683 -213.568,-194.723 -211.825,-194.723 -211.413,-195.134 ; -231.6,-189.607 U1.27@-231.6,-189.078 ; -231.6,-189.607 U1.27@-231.6,-189.078 ; -231.6,-189.607 U1.27@-231.6,-189.078 ; ?.1@-211.716,-195.797 -211.413,-195.134 ; ?.1@-211.716,-195.797 -211.413,-195.134 ; ?.1@-211.716,-195.797 -211.413,-195.134 ; ?.1@-211.716,-195.797 -211.413,-195.134 ; ?.1@-211.716,-195.797 -211.413,-195.134 ; ?.1@-211.716,-195.797 -211.413,-195.134 ; ?.1@-211.716,-195.797 -211.413,-195.134 ; ?.1@-211.543,-195.852 -211.413,-195.134 ; ?.1@-211.543,-195.852 -211.413,-195.134 ; ?.1@-211.543,-195.852 -211.413,-195.134 ; ?.1@-211.543,-195.852 -211.413,-195.134 ; ?.1@-211.543,-195.852 -211.413,-195.134 ; ?.1@-211.543,-195.852 -211.413,-195.134 ; ?.1@-211.543,-195.852 -211.413,-195.134 ; ?.1@-211.413,-195.863 -211.413,-195.134 ; ?.1@-211.413,-195.863 -211.413,-195.134 ; ?.1@-211.413,-195.863 -211.413,-195.134 ; ?.1@-211.413,-195.863 -211.413,-195.134 ; ?.1@-211.413,-195.863 -211.413,-195.134 ; ?.1@-211.413,-195.863 -211.413,-195.134 ; ?.1@-211.413,-195.863 -211.413,-195.134 ; -211.413,-195.134 ?.1@-211.11,-195.797 ; -211.413,-195.134 ?.1@-211.284,-195.852 ; -211.413,-195.134 ?.1@-211.11,-195.797 ; -211.413,-195.134 ?.1@-211.284,-195.852 ; -211.413,-195.134 ?.1@-211.11,-195.797 ; -211.413,-195.134 ?.1@-211.284,-195.852 ; -211.413,-195.134 ?.1@-211.11,-195.797 ; -211.413,-195.134 ?.1@-211.284,-195.852 ; -211.413,-195.134 ?.1@-211.11,-195.797 ; -211.413,-195.134 ?.1@-211.284,-195.852 ; -211.413,-195.134 ?.1@-211.11,-195.797 ; -211.413,-195.134 ?.1@-211.284,-195.852 ; -211.413,-195.134 ?.1@-211.11,-195.797 ; -211.413,-195.134 ?.1@-211.284,-195.852
C18: 
C19: 
CHRG: R12.1 U1.46 | length 87.5
  Top Layer w0.18: U1.46@-227.2,-184.323 -212.45,-184.323 v1(-212.425,-184.348) ; U1.46@-226.845,-184.323 -226.21,-184.323 ; U1.46@-226.845,-184.323 -226.21,-184.323 ; U1.46@-226.845,-184.323 -226.21,-184.323 ; -213.266,-184.323 v1@-212.457,-184.555 ; -213.266,-184.323 v1@-212.445,-184.139 ; -213.266,-184.323 v1(-212.425,-184.348) ; -213.266,-184.323 v1@-212.457,-184.555 ; -213.266,-184.323 v1@-212.445,-184.139 ; -213.266,-184.323 v1(-212.425,-184.348) ; -213.266,-184.323 v1@-212.457,-184.555 ; -213.266,-184.323 v1@-212.445,-184.139 ; -213.266,-184.323 v1(-212.425,-184.348) ; -213.266,-184.323 v1@-212.457,-184.555 ; -213.266,-184.323 v1@-212.445,-184.139 ; -213.266,-184.323 v1(-212.425,-184.348) ; v1@-212.457,-184.555 -213.265,-184.323 v1@-212.445,-184.139 ; v1(-205.35,-184.398) -198.794,-184.398 -197.855,-185.337 -197.855,-189.052 -196.483,-190.423 ; v1(-205.35,-184.398) -204.51,-184.398 ; v1(-205.35,-184.398) -204.51,-184.398 ; v1@-205.324,-184.606 -204.51,-184.398 ; v1@-205.324,-184.606 -204.51,-184.398 ; v1@-205.324,-184.606 -204.51,-184.398 ; v1@-205.324,-184.606 -204.51,-184.398 ; v1@-205.324,-184.189 -204.51,-184.398 ; v1@-205.324,-184.189 -204.51,-184.398 ; v1@-205.324,-184.189 -204.51,-184.398 ; v1@-205.324,-184.189 -204.51,-184.398 ; -196.483,-190.423 R12.1@-195.6,-190.423 ; -196.483,-190.423 R12.1@-195.638,-190.681 ; -196.483,-190.423 R12.1@-195.638,-190.166 ; -196.483,-190.423 R12.1@-195.638,-190.681 ; -196.483,-190.423 R12.1@-195.638,-190.166 ; -196.483,-190.423 R12.1@-195.638,-190.681 ; -196.483,-190.423 R12.1@-195.638,-190.166 ; -196.483,-190.423 R12.1@-195.6,-190.423 ; -196.483,-190.423 R12.1@-195.638,-190.681 ; -196.483,-190.423 R12.1@-195.638,-190.166 ; -196.483,-190.423 R12.1@-195.6,-190.423
  Bottom Layer w0.18: v1(-212.425,-184.348) -205.4,-184.348 v1(-205.35,-184.398) ; v1(-212.425,-184.348) -211.585,-184.348 ; v1(-212.425,-184.348) -211.585,-184.348 ; v1@-212.399,-184.556 -211.585,-184.348 ; v1@-212.399,-184.556 -211.585,-184.348 ; v1@-212.399,-184.556 -211.585,-184.348 ; v1@-212.399,-184.556 -211.585,-184.348 ; v1@-212.399,-184.139 -211.585,-184.348 ; v1@-212.399,-184.139 -211.585,-184.348 ; v1@-212.399,-184.139 -211.585,-184.348 ; v1@-212.399,-184.139 -211.585,-184.348 ; -206.195,-184.348 v1@-205.388,-184.604 ; -206.195,-184.348 v1@-205.364,-184.188 ; -206.195,-184.348 v1(-205.35,-184.398) ; -206.195,-184.348 v1@-205.388,-184.604 ; -206.195,-184.348 v1@-205.364,-184.188 ; -206.195,-184.348 v1(-205.35,-184.398) ; -206.195,-184.348 v1@-205.388,-184.604 ; -206.195,-184.348 v1@-205.364,-184.188 ; -206.195,-184.348 v1(-205.35,-184.398) ; -206.195,-184.348 v1@-205.388,-184.604 ; -206.195,-184.348 v1@-205.364,-184.188 ; -206.195,-184.348 v1(-205.35,-184.398) ; v1@-205.389,-184.604 -206.189,-184.348 v1@-205.364,-184.188
CHRG1: R12.2 U4.1 | length 24.7
  Top Layer w0.203: R12.2@-194.1,-190.423 -192.624,-190.423 U4.1@-192.55,-190.498 ; R12.2@-194.1,-190.423 -193.14,-190.423 ; R12.2@-194.1,-190.423 -193.14,-190.423 ; R12.2@-194.068,-190.67 -193.14,-190.423 ; R12.2@-194.068,-190.67 -193.14,-190.423 ; R12.2@-194.068,-190.67 -193.14,-190.423 ; R12.2@-194.068,-190.67 -193.14,-190.423 ; R12.2@-194.068,-190.177 -193.14,-190.423 ; R12.2@-194.068,-190.177 -193.14,-190.423 ; R12.2@-194.068,-190.177 -193.14,-190.423 ; R12.2@-194.068,-190.177 -193.14,-190.423 ; -193.516,-190.423 U4.1@-192.601,-190.741 ; -193.516,-190.423 U4.1@-192.563,-190.25 ; -193.516,-190.423 U4.1@-192.55,-190.498 ; -193.516,-190.423 U4.1@-192.601,-190.741 ; -193.516,-190.423 U4.1@-192.563,-190.25 ; -193.516,-190.423 U4.1@-192.55,-190.498 ; -193.516,-190.423 U4.1@-192.601,-190.741 ; -193.516,-190.423 U4.1@-192.563,-190.25 ; -193.516,-190.423 U4.1@-192.55,-190.498 ; -193.516,-190.423 U4.1@-192.601,-190.741 ; -193.516,-190.423 U4.1@-192.563,-190.25 ; -193.516,-190.423 U4.1@-192.55,-190.498 ; U4.1@-192.601,-190.741 -193.508,-190.424 U4.1@-192.563,-190.25
DM: U1.35
DP: U1.36
GND: *.1@-226.925,-177.623 *.1@-226.975,-180.758 BAT.GND BAT.GND/2 BAT.GND/3 C2.2 C8.2 C9.2 C10.2 C12.1 C13.1 C15A.1 CV1.1 pad.@-182.6,-191.193 R8.2 R08.2 R09.1 R19.1 R21.1 R22.1 R30.2 SW1.0 SW1.0/2 SW1.0/3 SW1.0/4 TYPC.1 TYPC.6 U1.49 U2.12 U3.1 U4.2 X1.0
  other v1: -186.725,-201.398 -182.45,-201.148 -180.45,-201.148 -183.05,-199.273 -181.675,-199.248 -188.25,-197.648 -184.95,-197.573 -181.675,-197.573 -180.45,-197.573 -183.1,-197.548 -180.375,-195.523 -186.825,-194.786 -180.35,-193.648 -185.225,-193.448 -186.85,-193.423 -182.35,-193.398 -183.65,-193.373 -180.375,-191.973 -181.75,-191.893 -186.825,-191.873 -185.2,-191.773 -183.625,-191.773 -194.125,-191.648 -193.425,-191.668 -191.6,-191.173 -240.875,-190.223 -180.25,-190.198 -185.15,-190.173 -183.5,-190.148 -181.775,-190.148 -186.875,-190.123 -251.425,-188.498 -180.25,-188.413 -240.9,-188.018 -251.45,-187.773 -231.45,-187.098 -229.003,-187.048 -195.775,-186.948 -194.475,-186.496 -193.375,-186.473 -218.716,-186.373 -240.875,-186.223 -204.675,-186.131 -230.199,-185.724 -194.575,-185.423 -199.325,-185.398 -204.725,-185.373 -203.15,-185.373 -201.125,-185.373 -195.775,-185.368 -215.275,-185.198 -213.5,-185.198 -218.7,-185.173 -216.9,-185.148 -180.475,-184.85 -182.725,-184.796 -181.625,-184.798 -185.425,-184.778 -228.95,-184.423 -231.3,-184.398 -246.675,-183.573 -246.1,-183.573 -180.492,-183.528 -181.4,-183.473 -223.275,-183.373 -219.625,-183.323 -211.45,-183.333 -217.725,-183.298 -215.725,-183.294 -213.8,-183.248 -187.05,-183.023 -226.275,-181.573 -217.35,-181.193 -213.475,-181.193 -211.3,-181.148 -219.2,-181.098 -215.575,-181.098 -190.625,-181.068 -229.245,-180.116 -226.25,-180.073 -197.2,-179.223 -201.85,-179.198 -190.575,-179.198 -199.625,-179.173 -195.025,-179.173 -192.8,-179.123 -213.525,-179.048 -211.175,-178.998 -217.525,-178.976 -215.65,-178.973 -220.075,-178.948 -218.85,-178.948 -226.232,-178.778 -186.875,-177.723 -201.9,-177.673 -203.848,-177.65 -199.675,-177.648 -197.1,-177.648 -181.6,-177.65 -226.232,-177.623 -217.45,-177.623 -213.325,-177.623 -209.725,-177.623 -207.875,-177.623 -205.825,-177.623 -224.2,-177.598 -220.05,-177.598 -211.275,-177.598 -195.025,-177.598 -192.75,-177.598 -218.783,-177.573 -215.6,-177.573 -190.6,-177.573 -221.7,-177.548
LED0: NUM_LED.6 U2.6 | length 111.8
  Top Layer w0.18: NUM_LED.6@-208.634,-192.23 -208.693,-190.867 ; NUM_LED.6@-208.633,-192.232 -208.686,-190.914 ; NUM_LED.6@-208.632,-192.236 -208.721,-190.814 ; NUM_LED.6@-208.631,-192.242 -208.7,-190.949 ; NUM_LED.6@-208.627,-192.256 -208.731,-190.958 ; NUM_LED.6@-208.623,-192.267 -208.765,-190.94 ; NUM_LED.6@-208.621,-192.273 -208.795,-190.899 ; NUM_LED.6@-208.452,-192.21 -208.693,-190.867 ; NUM_LED.6@-208.451,-192.213 -208.721,-190.814 ; NUM_LED.6@-208.451,-192.212 -208.686,-190.914 ; NUM_LED.6@-208.449,-192.219 -208.7,-190.949 ; NUM_LED.6@-208.446,-192.228 -208.731,-190.958 ; NUM_LED.6@-208.443,-192.235 -208.765,-190.94 ; NUM_LED.6@-208.442,-192.238 -208.795,-190.899 ; NUM_LED.6@-208.277,-192.166 -208.693,-190.867 ; NUM_LED.6@-208.274,-192.172 -208.7,-190.949 ; NUM_LED.6@-208.272,-192.176 -208.731,-190.958 ; NUM_LED.6@-208.271,-192.179 -208.765,-190.94 ; NUM_LED.6@-208.27,-192.181 -208.795,-190.899 ; NUM_LED.6@-208.091,-192.242 -208.091,-191.457 -209.3,-190.248 -209.3,-186.066 -205.955,-182.721 U2.6@-205.955,-181.623 ; NUM_LED.6@-207.925,-191.98 -208.731,-190.958 ; NUM_LED.6@-207.922,-191.984 -208.7,-190.949 ; NUM_LED.6@-207.92,-191.988 -208.686,-190.914 ; NUM_LED.6@-207.919,-191.99 -208.693,-190.867 ; NUM_LED.6@-207.918,-191.991 -208.721,-190.814 ; NUM_LED.6@-207.791,-191.859 -208.731,-190.958 ; NUM_LED.6@-207.786,-191.866 -208.7,-190.949 ; NUM_LED.6@-207.777,-191.878 -208.693,-190.867 ; NUM_LED.6@-207.776,-191.88 -208.721,-190.814 ; NUM_LED.6@-207.678,-191.714 -208.765,-190.94 ; NUM_LED.6@-207.676,-191.715 -208.795,-190.899 ; NUM_LED.6@-207.674,-191.718 -208.731,-190.958 ; NUM_LED.6@-207.666,-191.728 -208.7,-190.949 ; NUM_LED.6@-207.656,-191.739 -208.686,-190.914 ; NUM_LED.6@-207.65,-191.747 -208.693,-190.867 ; NUM_LED.6@-207.647,-191.75 -208.721,-190.814 ; -208.816,-190.732 -208.625,-192.261 -208.816,-190.732 ; -208.816,-190.732 -207.653,-191.743 -208.816,-190.732 ; -208.816,-190.732 -208.446,-192.228 -208.816,-190.732 ; -208.816,-190.732 NUM_LED.6@-207.78,-191.873 ; -208.816,-190.732 -208.273,-192.174 -208.816,-190.732 ; -208.816,-190.732 -207.921,-191.986 -208.816,-190.732 ; -208.816,-190.732 NUM_LED.6@-208.091,-192.092 ; -208.816,-190.732 NUM_LED.6@-207.78,-191.873 ; -208.816,-190.732 NUM_LED.6@-208.091,-192.092 ; -208.795,-190.899 -207.793,-191.855 -208.765,-190.94 ; -208.795,-190.899 -207.927,-191.978 -208.765,-190.94 ; -208.795,-190.899 NUM_LED.6@-208.091,-192.092 ; -208.765,-190.94 NUM_LED.6@-208.091,-192.092 ; -208.731,-190.958 NUM_LED.6@-208.091,-192.092 ; -208.721,-190.814 -208.276,-192.167 -208.686,-190.914 ; -208.721,-190.814 NUM_LED.6@-208.091,-192.092 ; -208.7,-190.949 NUM_LED.6@-208.091,-192.092 ; -208.693,-190.867 NUM_LED.6@-208.091,-192.092 ; -208.686,-190.914 NUM_LED.6@-207.78,-191.873 ; -208.686,-190.914 NUM_LED.6@-208.091,-192.092 ; U2.6@-206.109,-181.793 -205.955,-182.563 ; U2.6@-206.109,-181.793 -205.955,-182.563 ; U2.6@-206.109,-181.793 -205.955,-182.563 ; U2.6@-206.109,-181.793 -205.955,-182.563 ; U2.6@-206.109,-181.793 -205.955,-182.563 ; -205.955,-182.563 U2.6@-205.801,-181.793 ; -205.955,-182.563 U2.6@-205.955,-181.778 ; -205.955,-182.563 U2.6@-205.801,-181.793 ; -205.955,-182.563 U2.6@-205.955,-181.778 ; -205.955,-182.563 U2.6@-205.801,-181.793 ; -205.955,-182.563 U2.6@-205.955,-181.778 ; -205.955,-182.563 U2.6@-205.801,-181.793 ; -205.955,-182.563 U2.6@-205.955,-181.778 ; -205.955,-182.563 U2.6@-205.801,-181.793 ; -205.955,-182.563 U2.6@-205.955,-181.778
LED1: NUM_LED.5 U2.7 | length 5273.2